# Altium PCB ECG_FrontEnd.PcbDoc
Units mm, origin at the board's own origin, x right, y up, seen from the top; angles counter-clockwise.
Board outline 60 x 45 mm, 2 copper layers (Top Layer, Bottom Layer), stack 1.581 mm thick; 34 components, 23 nets, 97 pads, 17 vias.
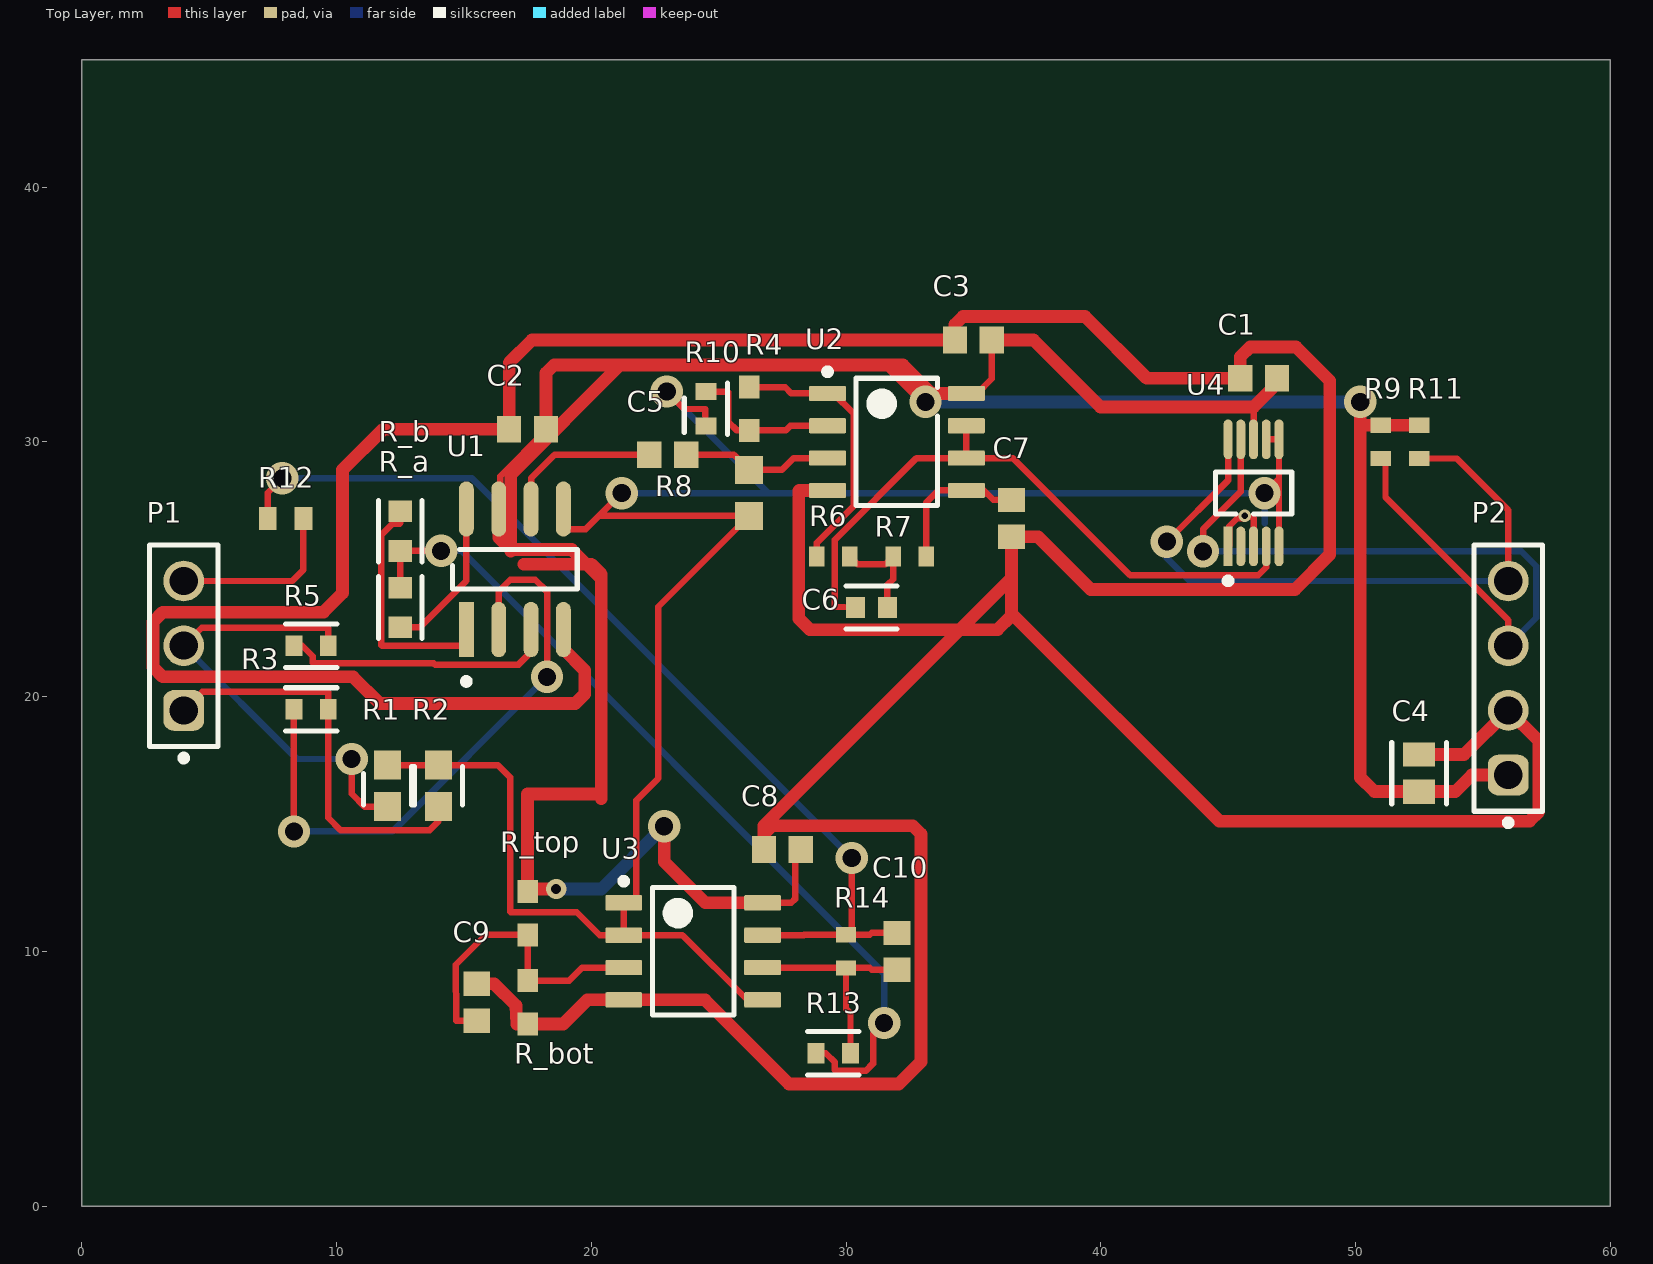
[diagram p0: Top Layer view]
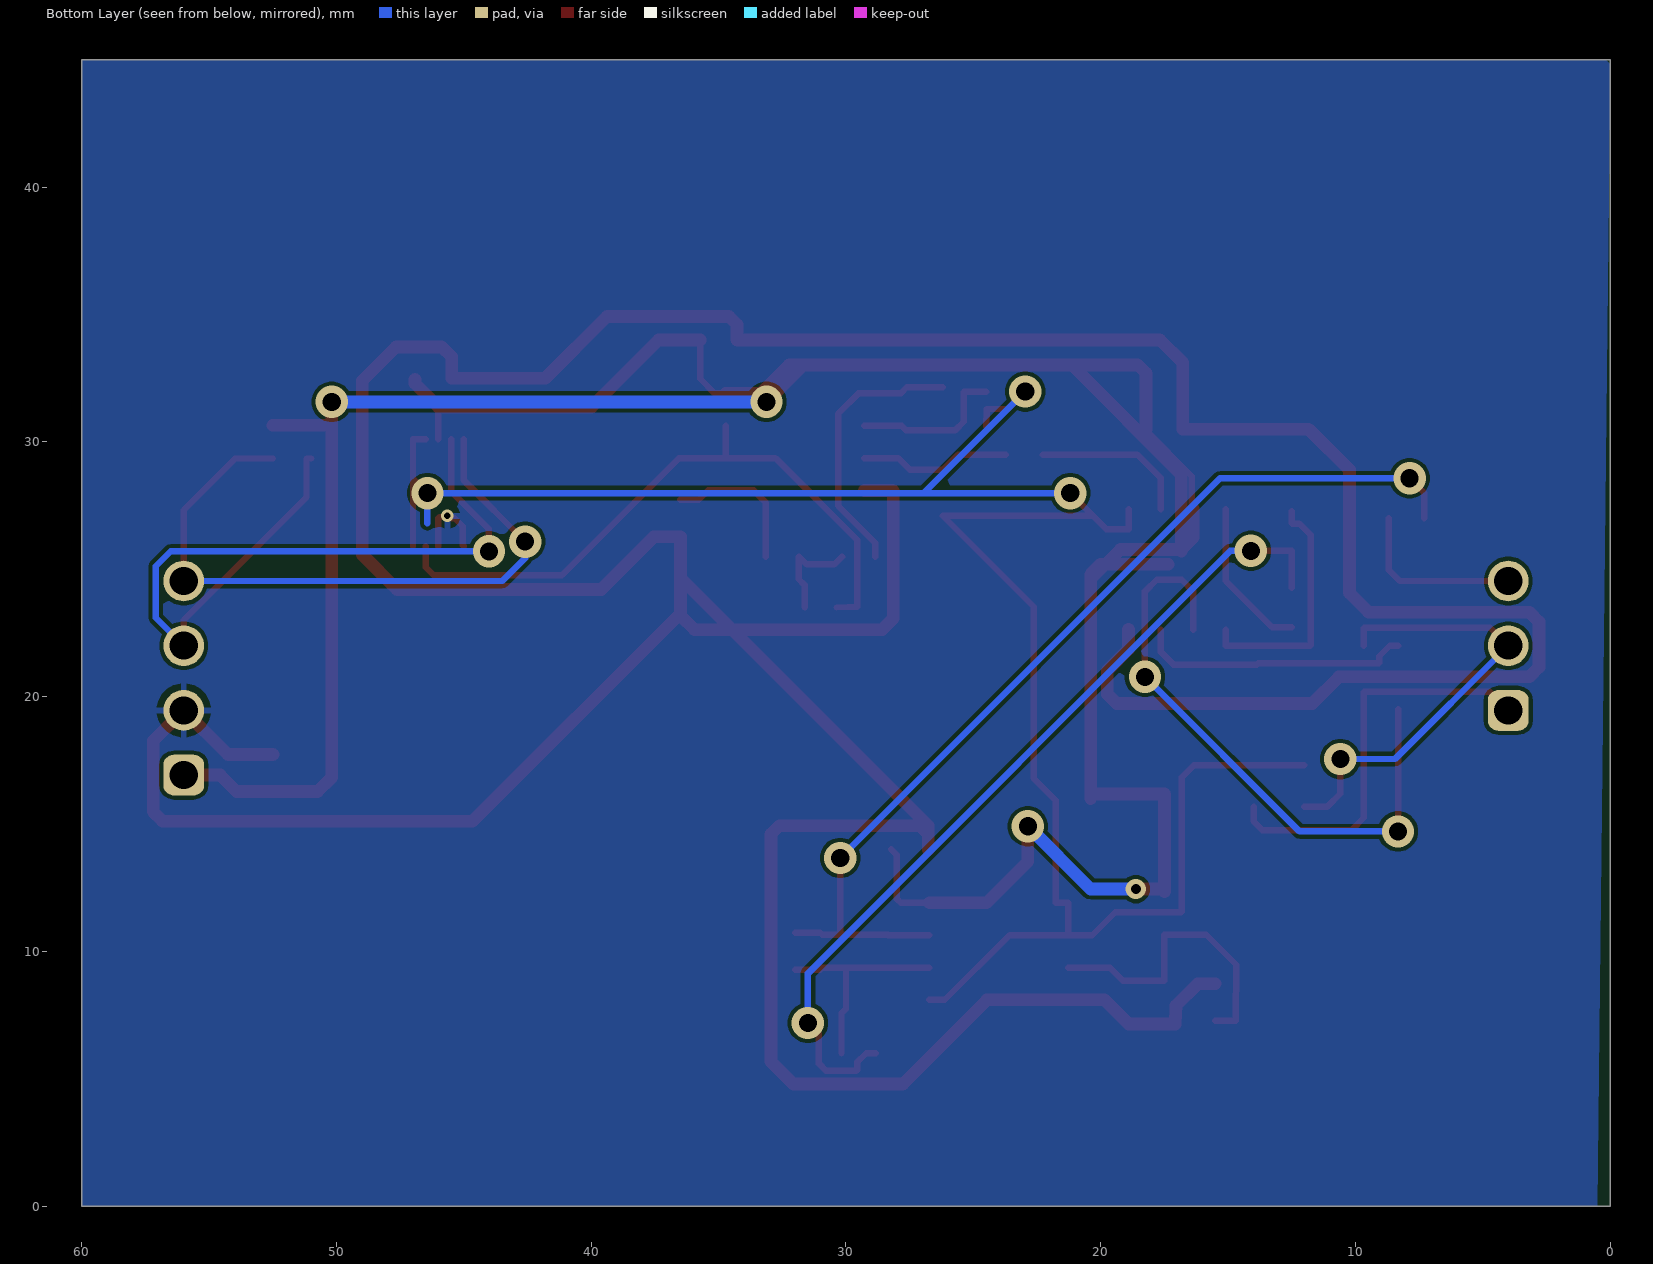
[diagram p1: Bottom Layer view, seen from below]
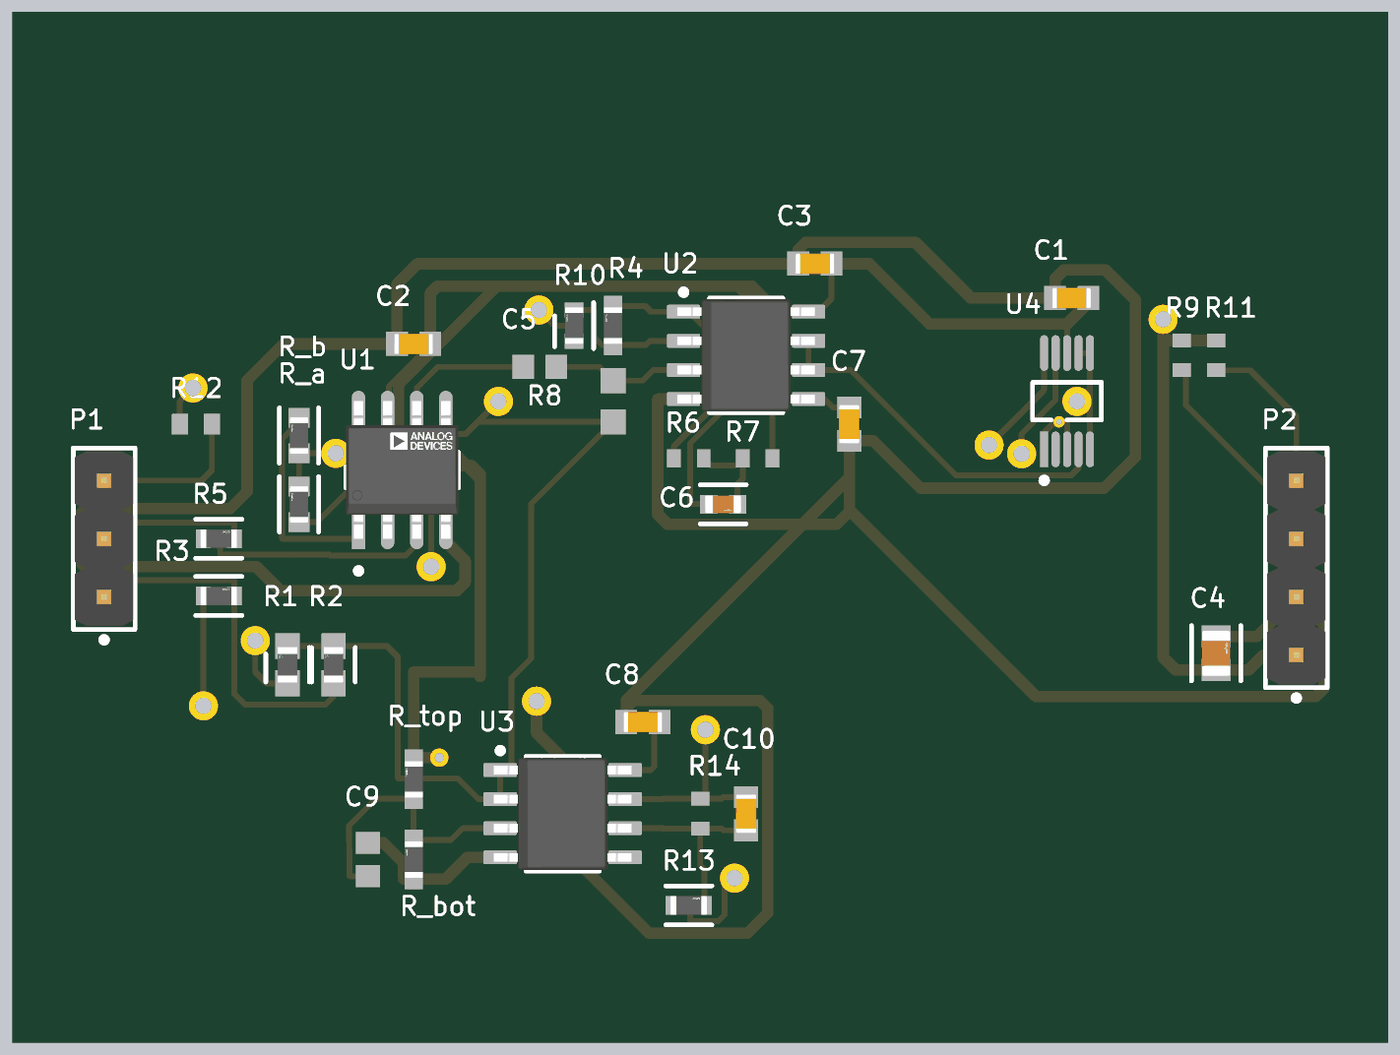
[diagram p2: 3D render of the assembled board from above, using the file's embedded part models]

## Layer stack, top to bottom
Top Solder: solder mask 0.0102, Solder Resist, Dk 3.5
Top Layer: signal copper 0.0356
Dielectric 1: dielectric 1.51, FR-4, Dk 4.8
Bottom Layer: signal copper 0.0356
Bottom Solder: solder mask 0.0102, Solder Resist, Dk 3.5

## Board outline
0,0 0,45 60,45 60,0

## Design rules (kind name [scope] priority, off if disabled: settings)
Clearance [All] p1: gap=0.15 ignorepadtopadclearanceinfootprint=FALSE
MinimumSolderMaskSliver [All] p1: minsoldermaskwidth=0.1
PolygonConnect [All] p1: connectstyle=Relief reliefconductorwidth=0.254 reliefentries=4 polygonreliefangle="90 Angle" airgapwidth=0.254
RoutingVias [All] p1: holewidth=0.3 width=0.6 viastyle="Through Hole" minholewidth=0.25 minwidth=0.5 maxholewidth=0.711 maxwidth=1.27
SolderMaskExpansion [All] p1: expansion=0 istentingtop=FALSE
SupplyNets "Schematic Supply Nets_1" [InNet('+5v')] p1: voltage=0.000
SupplyNets "Schematic Supply Nets" [InNet('GND')] p2: voltage=0.000
Width Width_Power [InNet('+5v') OR InNet('GND')] p1: maxlimit=1 minlimit=0.254 preferedwidth=0.5
Width [All] p2: maxlimit=1 minlimit=0.15 preferedwidth=0.254
29 further rules are at their usual default settings.

## Components (designator, comment, footprint, x,y, rotation, side; value= is the part's Value field where it differs from the comment)
C1 "GRM188R71H104KA93D" CAPC1608X90X35ML10T15 46.2,32.5 r0 top
C2 "GRM188R71H104KA93D" CAPC1608X90X35ML10T15 17.5,30.5 r0 top
C3 "GRM188R71H104KA93D" CAPC1608X90X35ML10T15 35,34 r0 top
C4 "GRM21BR61C106KE15L" FP-GRM21B-0_1-IPC_C 52.5,17 r90 top
C5 "GRM188R71C105KA12D" CAPC1608X90X35ML10T15 23,29.5 r0 top
C6 "GRM188R71H224KAC4D" FP-GRM188-0_1-e0_2_0_5-IPC_C 31,23.5 r0 top
C7 "GRM188R71H104KA93D" CAPC1608X90X35ML10T15 36.5,27 r90 top
C8 "GRM188R71H104KA93D" CAPC1608X90X35ML10T15 27.5,14 r0 top
C9 "GRM188R71C105KA12D" CAPC1608X90X35ML10T15 15.5,8 r90 top
C10 "GRM188R71H103KA01D" CAPC1608X90X35ML10T15 32,10 r90 top
P1 "61300311121" 61300311121 4,22 r90 top
P2 "61300411121" 61300411121 56,20.73 r90 top
R1 "CRCW060310M0FKEA" FP-CRCW0603-e3-IPC_A 12,16.5 r90 top
R2 "CRCW060310M0FKEA" FP-CRCW0603-e3-IPC_A 14,16.5 r90 top
R3 "RC0603FR-0710KL" FP-RC0603-0_55-IPC_C 9,19.5 r0 top
R4 "RC0603FR-07100KL" FP-RC0603-0_55-MFG 26.2,31.3 r90 top
R5 "RC0603FR-0710KL" FP-RC0603-0_55-IPC_C 9,22 r0 top
R6 "RC0603FR-0727KL" RESC1608X55X25LL10T15 29.5,25.5 r0 top
R7 "RC0603FR-0727KL" RESC1608X55X25LL10T15 32.5,25.5 r0 top
R8 "330K 1% 0603(1608)" RESC0603(1608)_M 26.2,28 r90 top value="330000.00 Ohm"
R9 "RC0603FR-074K7L" RESC1608X55X25LL10T15 51,30 r90 top
R10 "RC0603FR-071KL" FP-RC0603-0_55-IPC_C 24.5,31.3 r90 top
R11 "RC0603FR-074K7L" RESC1608X55X25LL10T15 52.5,30 r90 top
R12 "390K 1% 0603(1608)" RESC0603(1608)_L 8,27 r0 top value="390000.00 Ohm"
R13 "RC0603FR-0720KL" FP-RC0603-0_55-IPC_C 29.5,6 r0 top
R14 "RC0603FR-071ML" RESC1608X55X25LL10T15 30,10 r90 top
R_a "RC0603FR-078K25L" FP-RC0603-0_55-IPC_B 12.5,26.5 r90 top
R_b "RC0603FR-078K25L" FP-RC0603-0_55-IPC_B 12.5,23.5 r90 top
R_bot "RC0603FR-07100KL" FP-RC0603-0_55-MFG 17.5,8 r90 top
R_top "RC0603FR-07100KL" FP-RC0603-0_55-MFG 17.5,11.5 r90 top
U1 "AD620ARZ-REEL7" FP-R-8-IPC_B 17,25 r90 top
U2 "OPA2333AIDR" D0008A_N 32,30 r0 top
U3 "OPA2333AIDR" D0008A_N 24,10 r0 top
U4 "ADS1115IDGSR" FP-DGS0010A-IPC_B 46,28 r90 top

## Footprints (in the part's own frame and the unit in brackets; to place one, negate y for a bottom-side part, rotate by r counter-clockwise, add the part's x,y. Pads: shape width x height; smd on the part's side, far side on the other; paste and mask are expansions set on the pad)
61300311121 [mm] "Pin Header, pitch 2.54 mm, THT, Vertical, single row, 3p"
  rrect50% 1.6x1.6 hole 1.1: 1(-2.54,0)
  round 1.6 hole 1.1: 2(0,0) 3(2.54,0)
  silkscreen extent -4.53,-1.35 3.96,1.34, body extent -3.81,-1.27 3.81,1.27, height 8.57
61300411121 [mm] "Pin Header, pitch 2.54 mm, THT, Vertical, single row, 4p"
  rrect50% 1.6x1.6 hole 1.1: 1(-3.81,0)
  round 1.6 hole 1.1: 2(-1.27,0) 3(1.27,0) 4(3.81,0)
  silkscreen extent -5.8,-1.35 5.23,1.34, body extent -5.08,-1.27 5.08,1.27, height 8.57
CAPC1608X90X35ML10T15 [mm] "Chip Capacitor, 2-Leads, Body 1.7x0.9mm, IPC Low Density"
  rect 0.95x1.05 smd: 1(-0.725,0) 2(0.725,0)
  body extent -0.85,-0.45 0.85,0.45, height 0.9
D0008A_N [mm] "SOIC, 8-Leads, Body 5x4mm, Pitch 1.27mm, IPC Medium Density"
  rrect17% 1.45x0.6 smd: 1(-2.725,1.905) 2(-2.725,0.635) 3(-2.725,-0.635) 4(-2.725,-1.905) 5(2.725,-1.905) 6(2.725,-0.635) 7(2.725,0.635) 8(2.725,1.905)
  silkscreen extent -2.85,-2.5 1.6,2.88, body extent -3,-2.45 3,2.45, height 1.63
FP-CRCW0603-e3-IPC_A [mm]
  rect 1.135x1.062 smd paste+0 mask+0: 1(-0.815,0) 2(0.815,0)
  silkscreen extent -0.75,-0.95 0.75,0.95, body extent -1.88,-1.03 1.88,1.03, height 0.25
FP-DGS0010A-IPC_B [mm]
  rect 1.557x0.35 smd paste+0 mask+0: 1(-2.101,1)
  rrect100% 1.557x0.35 smd paste+0 mask+0: 2(-2.101,0.5) 3(-2.101,0) 4(-2.101,-0.5) 5(-2.101,-1) 6(2.101,-1) 7(2.101,-0.5) 8(2.101,0) 9(2.101,0.5) 10(2.101,1)
  silkscreen extent -3.58,-1.5 0.82,1.5
FP-GRM21B-0_1-IPC_C [mm]
  rect 0.958x1.262 smd paste+0 mask+0: 1(-0.727,0) 2(0.727,0)
  silkscreen extent -1.21,-1.08 1.21,1.08, body extent -1.31,-0.77 1.31,0.77, height 0.25
FP-GRM188-0_1-e0_2_0_5-IPC_C [mm]
  rect 0.759x0.812 smd paste+0 mask+0: 1(-0.627,0) 2(0.627,0)
  silkscreen extent -1.01,-0.85 1.01,0.85, body extent -1.11,-0.55 1.11,0.55, height 0.25
FP-R-8-IPC_B [mm]
  rect 2.174x0.582 smd paste+0 mask+0: 1(-2.366,1.905)
  rrect100% 2.174x0.582 smd paste+0 mask+0: 2(-2.366,0.635) 3(-2.366,-0.635) 4(-2.366,-1.905) 5(2.366,-1.905) 6(2.366,-0.635) 7(2.366,0.635) 8(2.366,1.905)
  silkscreen extent -4.53,-2.45 0.78,2.45, body extent -3.7,-2.7 3.7,2.7, height 0.25
FP-RC0603-0_55-IPC_B [mm]
  rect 0.859x0.912 smd paste+0 mask+0: 1(-0.777,0) 2(0.777,0)
  silkscreen extent -1.21,-0.86 1.21,0.86, body extent -1.46,-0.71 1.46,0.71, height 0.25
FP-RC0603-0_55-IPC_C [mm]
  rect 0.659x0.812 smd paste+0 mask+0: 1(-0.677,0) 2(0.677,0)
  silkscreen extent -1.01,-0.85 1.01,0.85, body extent -1.11,-0.55 1.11,0.55, height 0.25
FP-RC0603-0_55-MFG [mm]
  rect 0.9x0.8 smd paste+0 mask+0: 1(-0.85,0) 2(0.85,0)
  body extent -1.4,-0.55 1.4,0.55, height 0.25
RESC0603(1608)_L [mm] "Chip Resistor, Body 1.6x0.8mm, IPC High Density"
  rect 0.7x0.9 smd: 1(-0.7,0) 2(0.7,0)
  body extent -0.85,-0.47 0.85,0.47, height 0.6
RESC0603(1608)_M [mm] "Chip Resistor, Body 1.6x0.8mm, IPC Low Density"
  rect 1.1x1.1 smd: 1(-0.9,0) 2(0.9,0)
  body extent -0.85,-0.47 0.85,0.47, height 0.6
RESC1608X55X25LL10T15 [mm] "Chip Resistor, 2-Leads, Body 1.60x0.80mm, IPC High Density"
  rect 0.6x0.8 smd: 1(-0.65,0) 2(0.65,0)
  body extent -0.85,-0.45 0.85,0.45, height 0.55

## Part data
C1 C2 C3 C7 C8: library part CMP-2100-03643-1, "Chip Capacitor, 0.1 uF, +/- 10%, 50 V, -55 to 125 degC, 0603 (1608 Metric), RoHS, Tape and Reel", Capacitance=100nF, Case Code (Imperial)=0603, Case Code (Metric)=1608, Dielectric=X7R, Dielectric Material=Ceramic, Insulation Resistance=10GR, Manufacturer=Murata, Max Operating Temperature=125degC, Min Operating Temperature=-55degC, Package Description="2-Pin Surface Mount Device, Body 1.6 x 0.8 mm", Package Quantity=1, Tolerance=10%, Voltage=50V, Case/Package=0603, Contact Plating=Tin, Datasheet URL=http://psearch.en.murata.com/capacitor/product/GRM188R71H104KA93%23.pdf, Datasheet Version=42675.0, Depth=0.8mm, Height=0.8mm, Lead Free=LeadFree, Length=1.6mm, Manufacturer URL=http://www.murata.com/, Material=Ceramic, Mount=SurfaceMount, Number of Pins=2, Package Reference=0603, Packaging=TapeandReel, Radiation Hardening=No, REACH SVHC=NoSVHC, RoHSCompliant=true, Termination=SMD/SMT, Thickness=0.035inch, Voltage Rating=50V, Voltage Rating (DC)=50V, Width=0.8mm
C4: library part CMP-2007-03453-2, "Chip Multilayer Ceramic Capacitors for General Purpose, 0805, 10uF, X5R, 15%, 10%, 16V", Capacitance=10uF, Case Code (Imperial)=0805, Case Code (Metric)=2012, Dielectric=X5R, Max Operating Temperature=85°C, Min Operating Temperature=-55°C, Package Quantity=1, Tolerance=10%, Voltage=16V, Case/Package=0805, Depth=1.25mm, Height=1.25mm, Lead Free="Lead Free", Length=2mm, Material=Ceramic, Mount="Surface Mount", Packaging="Tape and Reel", Radiation Hardening=No, REACH SVHC="No SVHC", Termination=SMD/SMT, Thickness=0.053inch, Voltage Rating=16V, Voltage Rating (DC)=16V, Width=1.25mm
C5 C9: library part CMP-2006-02845-1, Manufacturer=Murata, Part Number=GRM188R71C105KA12D
C6: library part CMP-06035-003691-1, "Chip Multilayer Ceramic Capacitors for General Purpose, 0603, 0.22uF, X7R, 15%, 10%, 50V", Capacitance=220nF, Case Code (Imperial)=0603, Case Code (Metric)=1608, Max Operating Temperature=125°C, Min Operating Temperature=-55°C, Tolerance=10%, Voltage Rating=50V, Case/Package=0603, Lead Free="Lead Free", Length=0.063inch, Mount="Surface Mount", Packaging="Tape and Reel", Thickness=0.035inch, Voltage Rating (DC)=50V, Width=0.031inch
C10: library part CMP-2100-03642-1, "Chip Capacitor, 10 nF, +/- 10%, 50 V, -55 to 125 degC, 0603 (1608 Metric), RoHS, Tape and Reel", Capacitance=10nF, Case Code (Imperial)=0603, Case Code (Metric)=1608, Dielectric=X7R, Dielectric Material=Ceramic, Insulation Resistance=10GR, Manufacturer=Murata, Max Operating Temperature=125degC, Min Operating Temperature=-55degC, Package Description="2-Pin Surface Mount Device, Body 1.6 x 0.8 mm", Package Quantity=1, Tolerance=10%, Voltage=50V, Case/Package=0603, Datasheet URL=http://search.murata.co.jp/Ceramy/image/img/A01X/G101/ENG/GRM188R71H103KA01-01.pdf, Datasheet Version=42401.0, Depth=0.8mm, Height=0.8mm, Lead Free=LeadFree, Length=1.6mm, Manufacturer URL=http://www.murata.com/, Material=Ceramic, Mount=SurfaceMount, Number of Pins=2, Package Reference=0603, Packaging=TapeandReel, REACH SVHC=Unknown, RoHSCompliant=True, Termination=SMD/SMT, Thickness=0.035inch, Voltage Rating=50V, Voltage Rating (DC)=50V, Width=0.031inch
P1: library part CMP-1502-01062-4, "THT Vertical Pin Header WR-PHD, Pitch 2.54 mm, Single Row, 3 pins", Color=Black, Contact Resistance=20mΩ, Current Rating=3A, Max Operating Temperature=105°C, Min Operating Temperature=-40°C, Operating Supply Voltage=250V, Connector Type="Male Pin", Contact Material=Gold, Contact Mating Length=5.9944mm, Contact Plating=Gold, Gender=Male, Height=8.94mm, Lead Free="Lead Free", Lead Pitch=2.54mm, Mount="Through Hole", Number of Contacts=3, Number of Pins=3, Number of Positions=3, Number of Rows=1, Orientation=Vertical, Packaging=Bulk, Pitch=2.54mm, RoHS=Compliant, Termination=Solder, Voltage Rating=250V
P2: library part CMP-1502-01064-4, "THT Vertical Pin Header WR-PHD, Pitch 2.54 mm, Single Row, 4 pins", Color=Black, Contact Resistance=20mΩ, Current Rating=3A, Max Operating Temperature=105°C, Min Operating Temperature=-40°C, Operating Supply Voltage=250V, Connector Type="Male Pin", Contact Material=Gold, Contact Mating Length=5.9944mm, Contact Plating=Gold, Gender=Male, Height=8.89mm, Lead Free="Lead Free", Lead Pitch=2.54mm, Mount="Through Hole", Number of Contacts=4, Number of Pins=4, Number of Positions=4, Number of Rows=1, Orientation=Vertical, Packaging=Bulk, Pitch=2.54mm, RoHS=Compliant, Termination=Solder, Voltage Rating=250V
R1 R2: library part CMP-2000-03843-2, "RES Thick Film, 10MΩ, 1%, 0.1W, 100ppm/°C, 0603", Case Code (Imperial)=0603, Case Code (Metric)=1608, Max Operating Temperature=155°C, Min Operating Temperature=-55°C, Package Quantity=5000, Power Rating=100mW, Resistance=10MR, Temperature Coefficient=100ppm/°C, Tolerance=1%, Voltage Rating=75V, Case/Package=0603, Composition="Thick Film", Contact Plating=Tin, Depth=0.85mm, Height=0.45mm, Lead Free="Lead Free", Length=1.55mm, Military Standard=Not, Mount="Surface Mount", Number of Terminations=2, Packaging="Tape and Reel", Radiation Hardening=No, Termination=SMD/SMT, Voltage Rating (DC)=75V, Weight=7.1E-05oz, Width=0.85mm, Working Voltage=75V
R3 R5: library part CMP-2100-03664-2, "RES 10K OHM 1% 1/10W 0603", Case Code (Imperial)=0603, Case Code (Metric)=1608, Max Operating Temperature=155°C, Max Power Dissipation=100mW, Min Operating Temperature=-55°C, Resistance=10kR, Resistance Tolerance=1%, Resistor Type="Thick Film", Temperature Coefficient=100ppm/°C, Voltage Rating=75V, Voltage Rating (DC)=50V, Case/Package=0603, Construction=Rectangular, Depth=0.8mm, Features="Moisture Resistant", Height=0.45mm, Lead Free="Lead Free", Lead Pitch=0.3mm, Length=1.6mm, Military Standard=Not, Number of Pins=2, Number of Terminations=2, Packaging="Tape and Reel", Power Rating=100mW, RoHS Compliant=Yes, Series=RC, Size Code=0603, Termination=SMD/SMT, Tolerance=1%, Weight=7.1E-05oz, Width=0.8mm
R4 R_bot R_top: library part CMP-2100-03662-2, "RES SMD 100K OHM 1% 1/10W 0603", Case Code (Imperial)=0603, Case Code (Metric)=1608, Max Operating Temperature=155°C, Max Power Dissipation=100mW, Min Operating Temperature=-55°C, Resistance=100kR, Resistance Tolerance=1%, Resistor Type="Thick Film", Temperature Coefficient=100ppm/°C, Voltage Rating=50V, Working Voltage=75V, Case/Package=0603, Construction=Rectangular, Depth=0.8mm, Features="Moisture Resistant", Height=0.45mm, Lead Free="Lead Free", Length=1.6mm, Military Standard=Not, Number of Pins=2, Number of Terminations=2, Packaging="Tape and Reel", Power Rating=100mW, REACH SVHC="No SVHC", RoHS Compliant=Yes, Series=RC, Technology="THICK FILM", Termination=SMD/SMT, Tolerance=1%, Voltage Rating (DC)=50V, Width=0.8mm
R6 R7: library part CMP-2000-06933-1, "Chip Resistor, 27 KOhm, +/- 1%, 0.1 W, -55 to 155 degC, 0603 (1608 Metric), RoHS, Tape and Reel", Case Code - in=0603, Case Code - mm=1608, Manufacturer=Yageo, Operating Temperature Range=-55Cto+155C, Package Description="2-Pin Surface Mount Device, Body 1.6 x 0.8 mm", Power Rating=100mW, Resistance=27kOhms, Temperature Coefficient=100PPM/C, Tolerance=1%, Voltage Rating=50V, Datasheet URL=http://www.yageo.com/documents/recent/PYu-RC_Group_51_RoHS_L_7.pdf, Datasheet Version="Rev. 7, 05/2017", Manufacturer URL=http://www.yageo.com/, Mounting Technology=SurfaceMount, Package Reference=0603, Packaging=Reel, Product=ThickFilmResistorsGeneralPurpose, Series=RC, Termination Style=SMD/SMT
R8: library part CMP-1012-00793-1, "330K 0.1W 1% 0603 (1608 Metric)  SMD", Case-EIA=0603, Case-Metric=1608, Power="0.1 W", Tolerance="1 %", Technology=SMT
R9 R11: library part CMP-2000-06942-1, "Chip Resistor, 4.7 KOhm, +/- 1%, 0.1 W, -55 to 155 degC, 0603 (1608 Metric), RoHS, Tape and Reel", Case Code - in=0603, Case Code - mm=1608, Manufacturer=Yageo, Operating Temperature Range=-55Cto+155C, Package Description="2-Pin Surface Mount Device, Body 1.6 x 0.8 mm", Power Rating=100mW, Resistance=4.7kOhms, Temperature Coefficient=100PPM/C, Tolerance=1%, Voltage Rating=50V, Datasheet URL=http://www.yageo.com/documents/recent/PYu-RC_Group_51_RoHS_L_7.pdf, Datasheet Version="Rev. 7, 05/2017", Manufacturer URL=http://www.yageo.com/, Mounting Technology=SurfaceMount, Package Reference=0603, Packaging=Reel, Product=ThickFilmResistorsGeneralPurpose, Series=RC, Termination Style=SMD/SMT
R10: library part CMP-1659-00009-5, "RES 1K OHM 1% 1/10W 0603", Case Code (Imperial)=0603, Case Code (Metric)=1608, Max Operating Temperature=155°C, Max Power Dissipation=100mW, Min Operating Temperature=-55°C, Resistance=1kR, Resistance Tolerance=1%, Resistor Type="Thick Film", Temperature Coefficient=100ppm/°C, Voltage Rating=50V, Case/Package=0603, Construction=Rectangular, Contact Plating=Tin, Depth=0.8mm, Features="Moisture Resistant", Height=0.45mm, Lead Free="Lead Free", Length=1.6mm, Military Standard=Not, Number of Terminations=2, Packaging="Tape and Reel", Power Rating=100mW, Radiation Hardening=No, REACH SVHC="No SVHC", RoHS Compliant=Yes, Series=RC, Size Code=0603, Technology="THICK FILM", Termination=SMD/SMT, Tolerance=1%
R12: library part CMP-1012-00802-1, "390K 0.1W 1% 0603 (1608 Metric)  SMD", Case-EIA=0603, Case-Metric=1608, Power="0.1 W", Tolerance="1 %", Technology=SMT
R13: library part CMP-2000-06932-2, "RES 20K OHM 1% 1/10W 0603", Case Code (Imperial)=0603, Case Code (Metric)=1608, Max Operating Temperature=155°C, Max Power Dissipation=100mW, Min Operating Temperature=-55°C, Package Quantity=1, Resistance=20kR, Resistance Tolerance=1%, Resistor Type="Thick Film", Temperature Coefficient=100ppm/°C, Voltage Rating=50V, Case/Package=0603, Construction=Rectangular, Depth=0.8mm, Features="Moisture Resistant", Height=0.022inch, Lead Free="Lead Free", Length=0.063inch, Military Standard=Not, Number of Pins=2, Number of Terminations=2, Packaging="Tape and Reel", Power Rating=100mW, REACH SVHC="No SVHC", RoHS Compliant=Yes, Series=RC, Size Code=0603, Technology="THICK FILM", Termination=SMD/SMT, Tolerance=1%, Voltage Rating (DC)=50V, Width=0.031inch
R14: library part CMP-1659-00056-1, "Chip Resistor, 1 MOhm, +/- 1%, 100 mW, -55 to 155 degC, 0603 (1608 Metric), RoHS, Tape and Reel", Capacitance="1 mF", Case\Package=Radial, Max Operating Temperature="85 degC", Min Operating Temperature="-40 degC", Package Quantity=200, Tolerance=20%, Voltage Rating="25 V", ComponentLink1Description="Manufacturer URL", ComponentLink1URL=http://www.yageo.com/, ComponentLink2Description=Datasheet, ComponentLink2URL=http://www.yageo.com/documents/recent/PYu-RC_Group_51_RoHS_L_04.pdf, DatasheetVersion="Rev. 4, 02/2016", Diameter="10 mm", Height="20 mm", Lead Pitch="5 mm", Length="20 mm", Mount="Through Hole", PackageDescription="2-Pin Surface Mount Device, Body 1.6 x 0.8 mm", PackageReference=0603, Packaging=Bulk, Radiation Hardening=No, REACH SVHC="No SVHC", RoHSCompliant=true, Voltage Rating (DC)="25 V", Width="0 inch"
R_a R_b: library part CMP-03412-037838-1, "RES 8.25K OHM 1% 1/10W 0603", Case Code (Imperial)=0603, Case Code (Metric)=1608, Max Operating Temperature=155°C, Max Power Dissipation=100mW, Min Operating Temperature=-55°C, Package Quantity=1, Resistance=8.25kR, Resistor Type="Thick Film", Temperature Coefficient=100ppm/°C, Tolerance=1%, Voltage Rating=50V, Case/Package=0603, Construction=Rectangular, Depth=0.8mm, Features="Moisture Resistant", Height=0.45mm, Lead Free="Lead Free", Length=1.6mm, Military Standard=Not, Mount="Surface Mount", Number of Terminations=2, Packaging="Tape and Reel", Power Rating=100mW, RoHS Compliant=Yes, Series=RC, Size Code=0603, Technology="THICK FILM", Termination=SMD/SMT, Voltage Rating (DC)=50V, Width=0.031inch
U1: library part CMP-09116-000354-1, "IC INST AMP 1 CIRCUIT 8SOIC", Case/Package=SOIC, Dual Supply Voltage=15V, Input Bias Current=500pA, Input Offset Voltage (Vos)=30mV, Input Resistance=10GR, Max Dual Supply Voltage=18V, Max Operating Temperature=125°C, Max Power Dissipation=650mW, Min Dual Supply Voltage=2.3V, Min Operating Temperature=-55°C, Min Supply Voltage=4.6V, Nominal Supply Current=900uA, Operating Supply Current=1.3mA, Output Current per Channel=18mA, Package Quantity=1, Power Supply Rejection Ratio (PSRR)=140dB, -3db Bandwidth=1MHz, Bandwidth=800kHz, Common Mode Rejection Ratio=93dB, Contact Plating=Tin, Lead Free="Contains Lead", Mount="Surface Mount", Number of Channels=1, Number of Circuits=1, Number of Elements=1, Number of Pins=8, Operating Supply Voltage=18V, Packaging="Tape and Reel", Power Dissipation=650mW, Radiation Hardening=No, RoHS Compliant=Yes, Series=-, Slew Rate=1.2V/µs, Supply Current=900uA
U2 U3: library part CMP-0272-00762-3, "17 uA, MicroPower, Precision, Zero Drift CMOS Operational Amplifier, 1.8 to 5.5 V, -40 to 125 degC, 8-pin SOIC (D8), Green (RoHS & no Sb/Br)", Manufacturer="Texas Instruments", Total Supply Voltage(Max)(+5V is 5, +/-5V is 10)=5.5, Total Supply Voltage(Min)(+5V is 5, +/-5V is 10)=1.8, CMRR(Min)(dB)=106, Code_JEDEC=MS-012, ComponentLink1Description="Manufacturer URL", ComponentLink1URL=http://www.ti.com/, ComponentLink2Description=Datasheet, ComponentLink2URL=http://www.ti.com/general/docs/lit/getliterature.tsp?genericPartNumber=OPA2333&fileType=pdf, ComponentLink3Description="Package Specification", ComponentLink3URL=http://www.ti.com/litv/pdf/msoi002j, DatasheetVersion=SBOS351C, Eco-Plan="Green (RoHS & no Sb/Br)", IIB(Max)(pA)=200, Iq per channel(Max)(mA)=0.025, Mounting Technology="Surface Mount", Number of Channels=2, Offset Drift(Typ)(uV/C)=0.02, PackageDescription="8-Pin Plastic Small Outline, Body 4.9 x 3.9 mm, Pitch 1.27 mm", PackageReference=D0008A, PackageVersion="4040047-3/M, 06/2011", PartNumber=OPA2333AIDR, Slew Rate(Typ)(V/us)=0.16, Sub Family="Low Offset Voltage Amplifier (<=500uV), Low Power Amp (<=500uA), Low Supply Voltage Amplifier (<=2.7V), Precision Amplifier, Zero Drift Precision Amplifier", Vio (25C)(Max)(mV)=0.01
U4: library part CMP-0003-00385-3, "IC ADC 16BIT SIGMA-DELTA 10VSSOP", Case/Package=VSSOP, Max Operating Temperature=125°C, Max Supply Voltage=5.5V, Min Operating Temperature=-40°C, Min Supply Voltage=2V, Package Quantity=2500, Power Dissipation=900uW, Contact Plating=Gold, Conversion Rate=0.86KS/s, Integral Nonlinearity (INL)=1LSB, Interface=I2C, Lead Free="Lead Free", Max Supply Voltage (DC)=5.5V, Min Supply Voltage (DC)=2V, Number of A/D Converters=1, Number of Bits=16, Number of Converters=1, Number of Inputs=4, Number of Pins=10, Packaging="Tape and Reel", Polarity=Bipolar, Radiation Hardening=No, REACH SVHC="No SVHC", Resolution=16b, RoHS Compliant=Yes, Sampling Rate=860S/s, Series=-, Supply Type=Single

## Via types
v1: diameter 1.27, hole 0.711, Top Layer to Bottom Layer, 15 vias
v2: diameter 0.5, hole 0.25, Top Layer to Bottom Layer, 1 vias
v3: diameter 0.8, hole 0.4, Top Layer to Bottom Layer, 1 vias

## Nets (pads, with @x,y where several pads share a name; then routed paths per layer and width w, separated by ;. In a path a pad name is that pad's centre, name@x,y a point inside that pad or via, vN(x,y) a via of type N, cw(c..) or ccw(c..) an arc to the next point about the centre after c; other vN are vias at no path point)
+5v: C1.2 C2.2 C3.2 C4.1 C8.2 P2.1 R9.2 R11.2 R_top.2 U1.7 U2.8 U3.8 U4.8 | length 133.5
  Top Layer w0.254: U1.7 16.428,27.429 16.428,28.653 18.225,30.45 C2.2 ; U3.8 27.851,11.905 28,12.054 28,13.775 C8.2 ; U2.8 35.15,31.905 35.725,32.48 C3.2 ; U4.8 46,31.525 46.925,32.45 C1.2
  Top Layer w0.5: U1.7 16.365,26.243 16.828,25.781 19.228,25.781 20.396,24.613 ; 16.84,25.717 16.84,27.366 16.84,28.727 21.133,33.02 ; 17.361,25.197 20.002,25.197 20.396,24.803 20.396,24.613 ; C2.2 18.225,32.703 18.543,33.02 32.235,33.02 33.35,31.905 U2.8 ; v3(18.618,12.446) 17.5,12.446 R_top.2 17.5,16.181 20.396,16.181 ; 20.396,15.994 20.396,16.181 ; v1(22.86,14.91) 22.86,13.531 24.486,11.905 U3.8 ; 31.674,33.02 v1(33.122,31.572) ; C3.2 37.363,34 39.994,31.369 45.999,31.369 46.925,32.295 C1.2@46.925,32.45 ; v1(50.19,31.572) 50.19,30.625 ; R11.2 R9.2 50.216,30.65 50.19,30.625 ; P2.1 54.571,16.92 53.924,16.273 C4.1 50.745,16.273 50.19,16.828 50.19,30.625 ; 20.396,16.181 20.396,24.613
  Bottom Layer w0.5: v3(18.618,12.446) 20.396,12.446 v1(22.86,14.91) ; v1(33.122,31.572) v1(50.19,31.572)
CM: R13.1 R_a.1 R_b.2 | length 33.8
  Top Layer w0.254: R_b.2 R_a.1 v1(14.104,25.723) ; R13.1 29.21,6 29.566,5.644 29.566,5.342 29.591,5.317 30.785,5.317 31.064,5.596 31.064,6.756 v1(31.496,7.188)
  Bottom Layer w0.254: v1(14.104,25.723) 14.908,25.723 31.496,9.135 v1(31.496,7.188)
FB_A: R4.1 R10.2 U2.2 | length 6.2
  Top Layer w0.254: R10.2 25.349,31.977 25.375,31.951 25.375,30.793 25.717,30.45 R4.1 27.635,30.45 27.82,30.635 U2.2
GND: C1.1 C2.1 C3.1 C4.2 C7.1 C8.1 C9.2 P2.2 R_bot.1 U1.4 U2.4 U3.4 U4.1 U4.3 | length 206.2
  Top Layer w0.254: U4.1 45.048,25.947 45.048,26.69 45.358,27 v2@45.65,27 ; v2(45.65,27.1) 45.697,27.053 45.947,27.053 46,27 U4.3
  Top Layer w0.5: C9.2 16.192,8.725 17.043,7.874 17.069,7.15 R_bot.1 18.898,7.15 19.843,8.095 U3.4 24.46,8.095 27.765,4.79 32.069,4.79 32.944,5.664 32.944,14.605 32.614,14.935 27.105,14.935 26.775,14.605 ; U1.4 18.905,21.872 19.746,21.031 19.746,20.105 19.367,19.727 11.693,19.727 10.643,20.777 3.175,20.777 2.794,21.158 2.794,22.936 3.175,23.317 9.487,23.317 10.236,24.066 10.236,28.905 11.831,30.5 C2.1 16.775,33.107 17.668,34 C3.1 34.275,34.608 34.593,34.925 39.383,34.925 41.808,32.5 C1.1 45.475,33.337 45.869,33.731 47.663,33.731 48.988,32.407 48.988,25.569 47.625,24.206 39.61,24.206 37.541,26.275 C7.1 36.5,24.66 ; C8.1 26.775,14.605 ; U2.4 28.169,28.095 28.143,28.07 28.143,23.063 28.575,22.631 34.471,22.631 ; C4.2 54.267,17.727 P2.2 57.201,18.259 57.201,15.481 56.832,15.113 44.653,15.113 36.5,23.266 ; 26.775,14.605 26.775,14.935 34.471,22.631 ; 34.471,22.631 36.5,24.66 ; 34.471,22.631 35.954,22.631 36.5,23.177 36.5,23.266 ; 36.5,23.266 36.5,24.66
HP_IN: C5.2 R8.2 U2.3 | length 6
  Top Layer w0.254: C5.2 25.6,29.5 R8.2 27.483,28.9 27.948,29.365 U2.3
HPF_OUT: R4.2 R6.1 U2.1 | length 10.7
  Top Layer w0.254: R4.2 27.61,32.15 27.855,31.905 U2.1 29.512,31.905 30.302,31.115 30.302,27.487 28.85,26.035 R6.1
INA_OUT: C5.1 U1.6 | length 6.2
  Top Layer w0.254: U1.6 17.635,28.575 18.56,29.5 C5.1
LP_B: C7.2 R7.2 U2.5 | length 5.8
  Top Layer w0.254: R7.2 33.15,27.622 33.622,28.095 U2.5 35.408,28.095 35.778,27.725 C7.2
LPF_OUT: C6.1 U2.6 U2.7 U4.4 | length 25.8
  Top Layer w0.254: C6.1 29.566,23.525 29.566,26.162 32.769,29.365 U2.6 ; U2.7 U2.6 ; U4.4 46.5,25.082 46.182,24.765 41.151,24.765 36.551,29.365 U2.6
NetC6_2: C6.2 R6.2 R7.1 | length 4
  Top Layer w0.254: R6.2 30.453,25.197 31.547,25.197 R7.1 31.85,24.607 31.627,24.384 C6.2
NetC9_1: C9.1 R_bot.2 R_top.1 U3.3 | length 12.1
  Top Layer w0.254: C9.1 14.707,7.275 14.681,9.474 15.857,10.65 R_top.1 R_bot.2 19.126,8.85 19.641,9.365 U3.3
NetP1_1: P1.1 R2.1 R3.2 | length 16.2
  Top Layer w0.254: P1.1 4.733,20.193 9.651,20.193 9.677,20.168 R3.2 9.677,15.24 10.158,14.759 13.652,14.759 14,15.106 R2.1
NetP1_2: P1.2 R1.1 R5.2 | length 18.1
  Top Layer w0.254: P1.2 4.708,22.708 9.651,22.708 9.677,22.682 R5.2 ; v1(10.592,17.551) 10.592,16.192 11.1,15.685 R1.1
  Bottom Layer w0.254: P1.2 8.449,17.551 v1(10.592,17.551)
NetR3_1: R3.1 U1.2 | length 24.4
  Top Layer w0.254: R3.1 8.323,14.715 v1(8.331,14.707) ; U1.2 16.365,24.13 16.822,24.587 17.805,24.587 18.263,24.13 v1(18.263,20.777)
  Bottom Layer w0.254: v1(8.331,14.707) 12.192,14.707 v1(18.263,20.777)
NetR5_1: R5.1 U1.3 | length 10.9
  Top Layer w0.254: R5.1 8.658,22 9.068,21.59 9.068,21.336 9.093,21.311 13.818,21.311 13.868,21.26 17.146,21.26 17.635,21.749 U1.3
NetR_a_2: R_a.2 U1.1 | length 9.7
  Top Layer w0.254: R_a.2 12.5,26.822 12.475,26.797 12.205,26.797 11.76,26.352 11.76,22.022 11.786,21.996 15.095,21.996 U1.1
NetR_b_1: R_b.1 U1.8 | length 6.2
  Top Layer w0.254: R_b.1 13.274,22.723 15.095,24.544 U1.8
RLD: P1.3 R12.2 | length 6.9
  Top Layer w0.254: P1.3 8.255,24.54 8.7,24.985 R12.2
RLD_N: C10.1 R13.2 R14.1 U3.6 | length 8.7
  Top Layer w0.254: U3.6 28.346,9.365 28.361,9.35 R14.1 ; R13.2 30.177,7.569 30,7.746 R14.1 ; C10.1 31.012,9.275 30.937,9.35 R14.1
RLD_OUT: C10.2 R12.1 R14.2 U3.7 | length 38.7
  Top Layer w0.254: R12.1 7.3,28.001 v1(7.874,28.575) ; U3.7 28.346,10.635 28.361,10.65 R14.2 R14.2@30.226,10.65 ; v1(30.226,13.665) R14.2@30.226,10.65 ; C10.2 31.012,10.725 30.937,10.65 R14.2@30.226,10.65
  Bottom Layer w0.254: v1(7.874,28.575) 15.316,28.575 v1(30.226,13.665)
SCL: P2.4 R11.1 U4.10 | length 26.6
  Top Layer w0.254: v1(42.596,26.086) 45,28.49 U4.10 ; R11.1 53.975,29.35 56,27.325 P2.4
  Bottom Layer w0.254: v1(42.596,26.086) 42.596,25.442 43.497,24.54 P2.4
SDA: P2.3 R9.1 U4.9 | length 31.4
  Top Layer w0.254: v1(44.018,25.705) 44.018,26.568 45.5,28.05 U4.9 ; R9.1 51.181,29.35 51.181,27.826 56,23.007 P2.3
  Bottom Layer w0.254: v1(44.018,25.705) 56.515,25.705 57.099,25.121 57.099,23.099 P2.3
VREF: R1.2 R2.2 R8.1 R10.1 U1.5 U3.1 U3.2 U3.5 U4.5 U4.6 U4.7 | length 90.4
  Top Layer w0.254: R1.2 R2.2 16.327,17.315 16.815,16.828 16.815,11.557 16.84,11.532 19.431,11.532 20.328,10.635 U3.2 ; U1.5 18.905,26.568 19.774,26.568 20.306,27.1 ; v1(21.196,27.991) 20.306,27.1 ; v1(22.962,31.979) 23.647,31.293 24.475,31.293 R10.1 ; U3.5 26.119,8.095 23.579,10.635 U3.2 ; v1@46.5,27.7 46.431,27.769 v1(46.431,27.991) 46.716,28.275 47,28.56 ; U4.7 U4.6 47,28.56 ; U4.5 47,27.991 47,28.56 ; 20.306,27.1 R8.1 22.631,23.531 22.631,16.789 21.768,15.926 21.768,11.905 U3.1 U3.2
  Bottom Layer w0.254: v1(21.196,27.991) 26.949,27.991 ; v1(22.962,31.979) 26.949,27.991 ; v1@46,27.991 26.949,27.991 ; v1@46,28 46.009,27.991 v1(46.431,27.991) 46.431,26.81 46.437,26.804
pads on no net: U4.2

## Polygon pours and split planes (outlines as drawn)
GND on Bottom Layer "GND_L02_P003" (solid, remove dead copper, pour order 3): 0.508,0 0,45 60,45 60,0

## Silkscreen, mask and mechanical layers (free items; w line width, h text height)
Mechanical 1:
  the board outline again, w0.254